# Altium PCB PCB-Oil Diffuser.PcbDoc (part 1 of 2)
Units mil, origin at the board's own origin, x right, y up, seen from the top; angles counter-clockwise.
Board outline 3000 x 3000 mil, 2 copper layers (Top Layer, Bottom Layer), stack 61.811 mil thick; 42 components, 28 nets, 129 pads, 48 vias.
Unrouted connection lines stored in the file: 7.
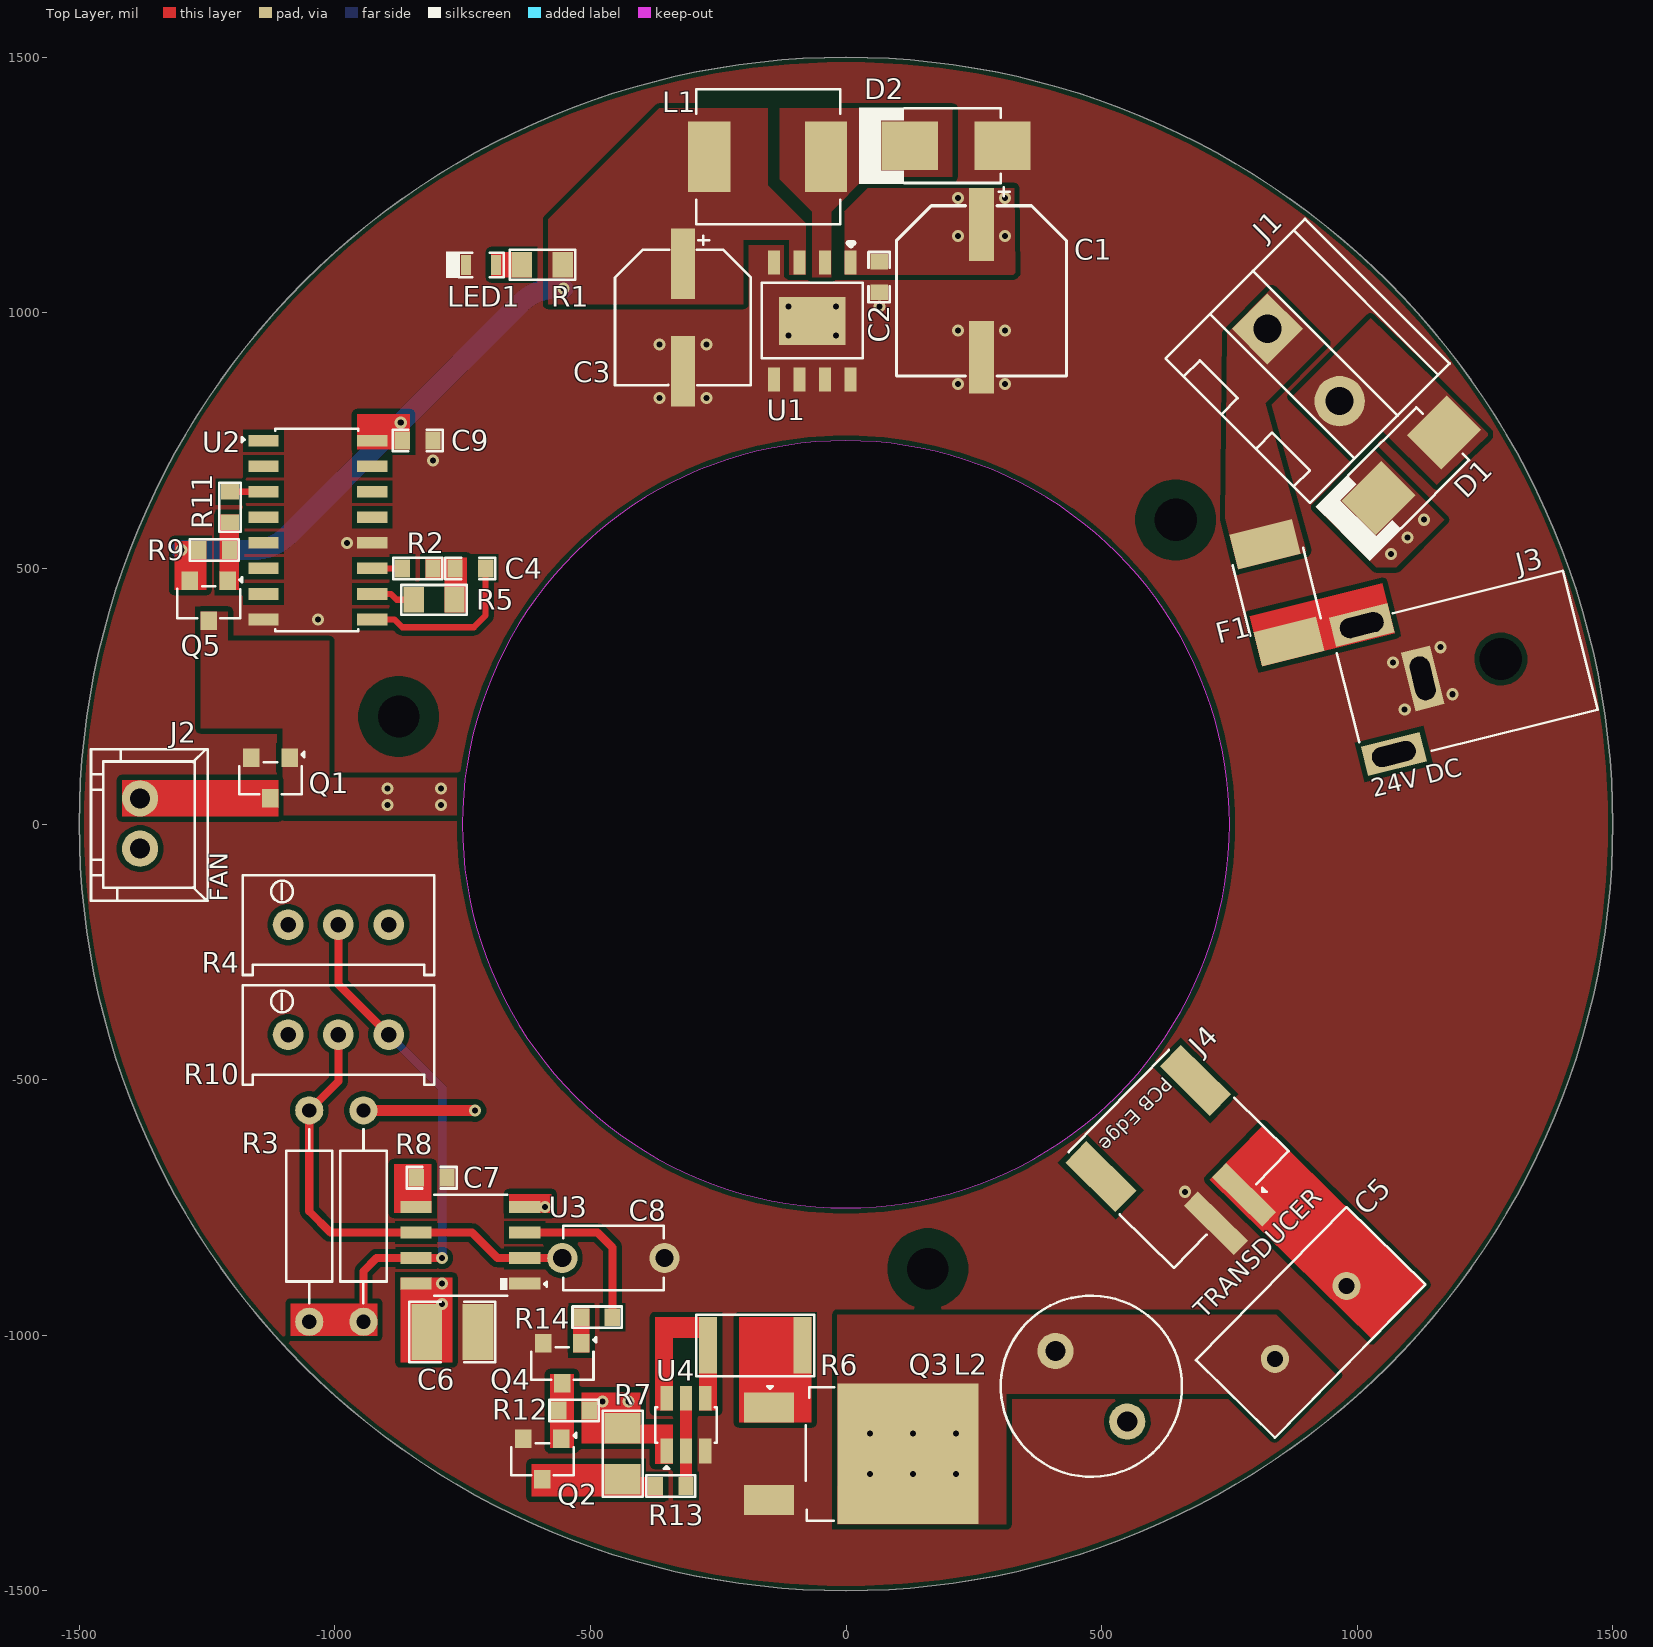
[diagram p0: Top Layer view]
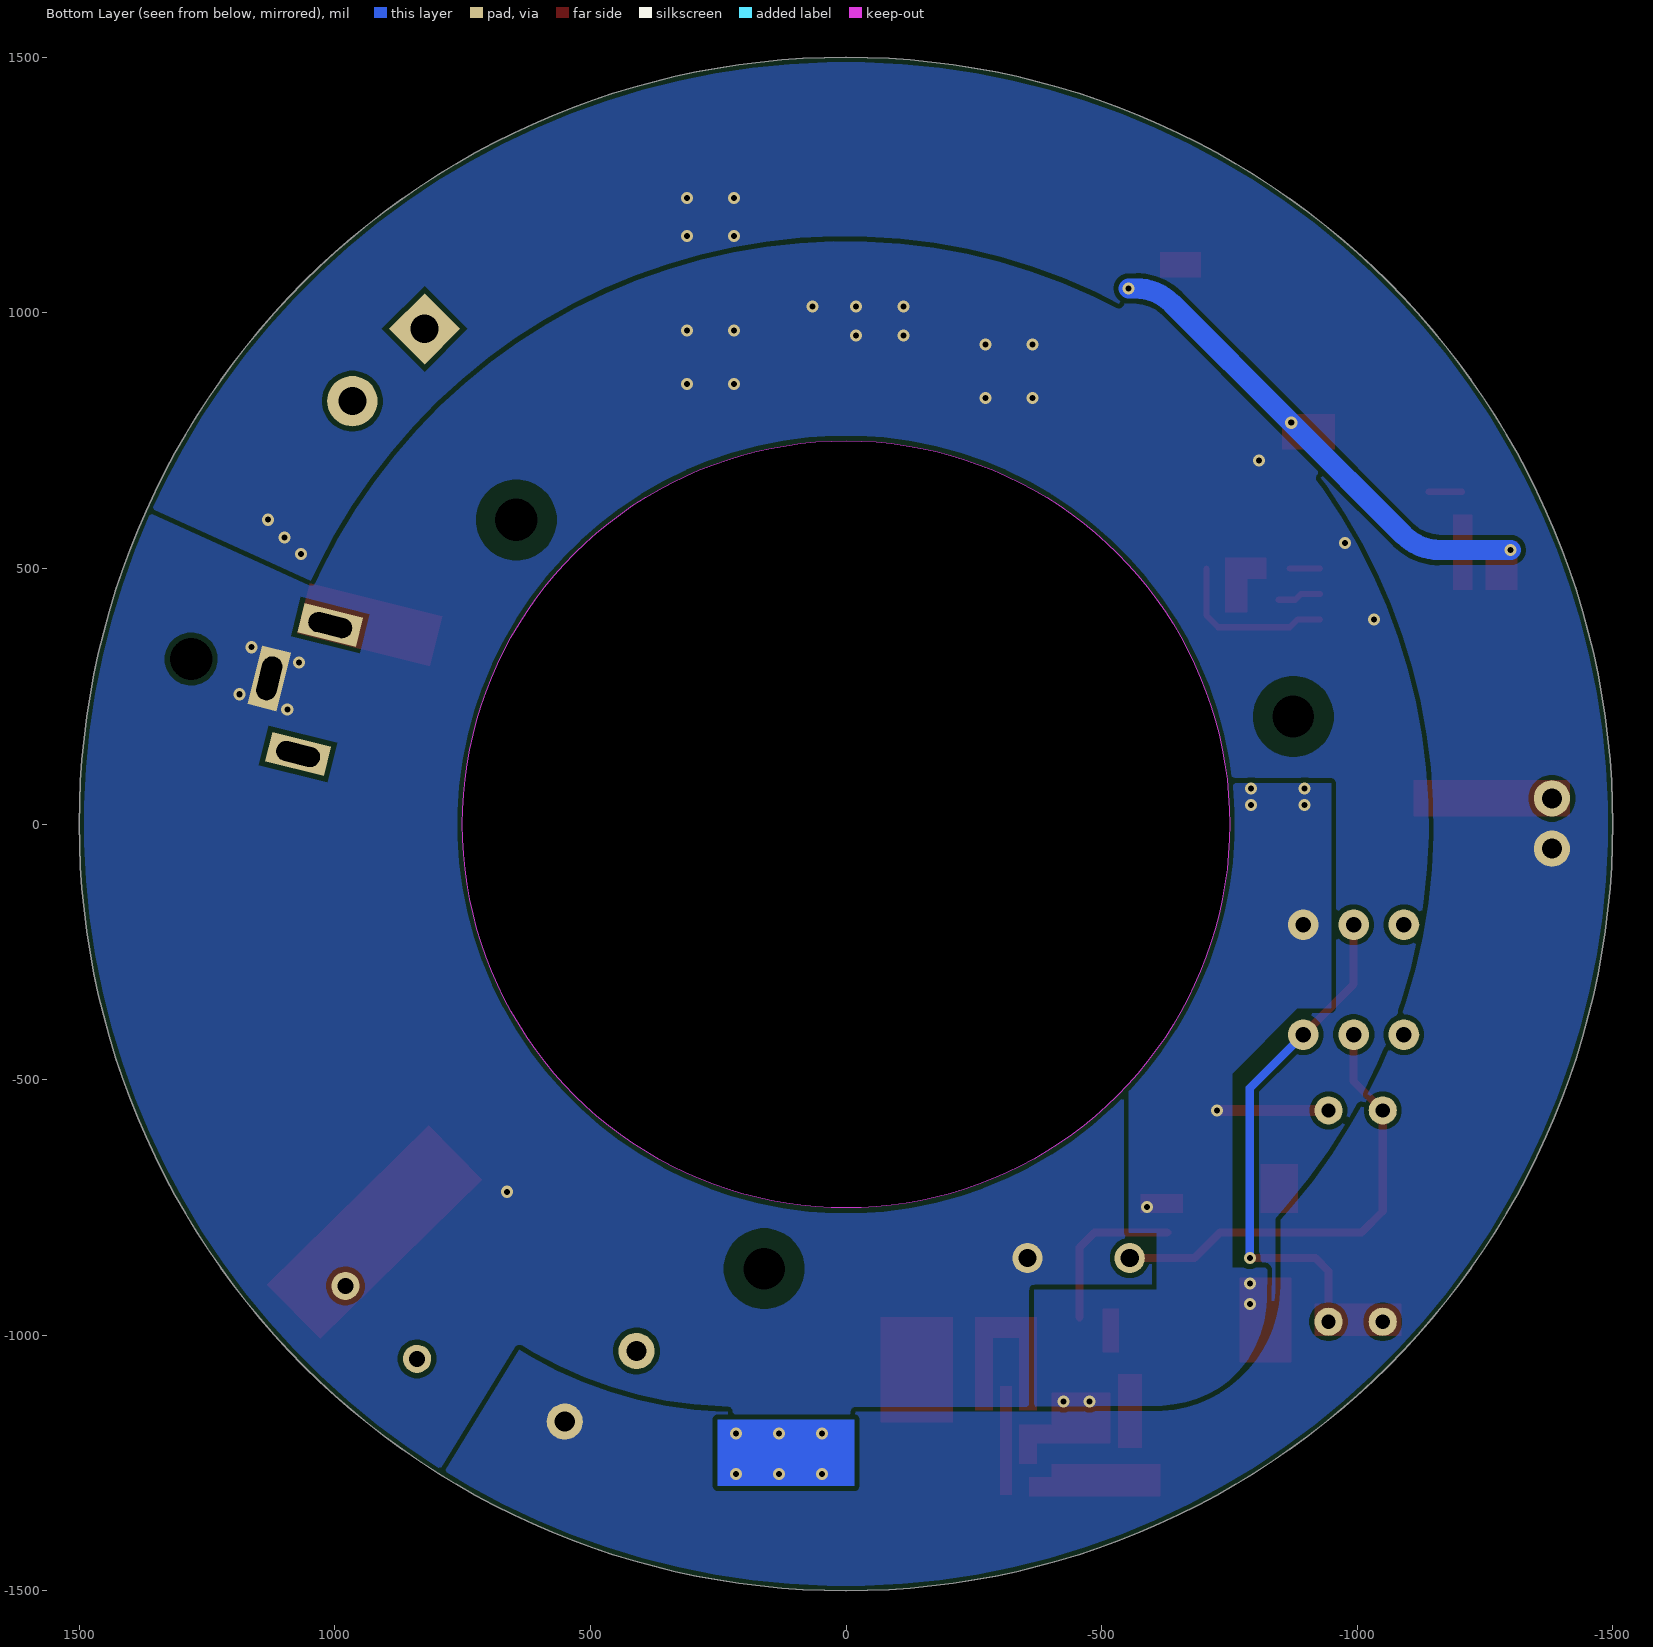
[diagram p1: Bottom Layer view, seen from below]
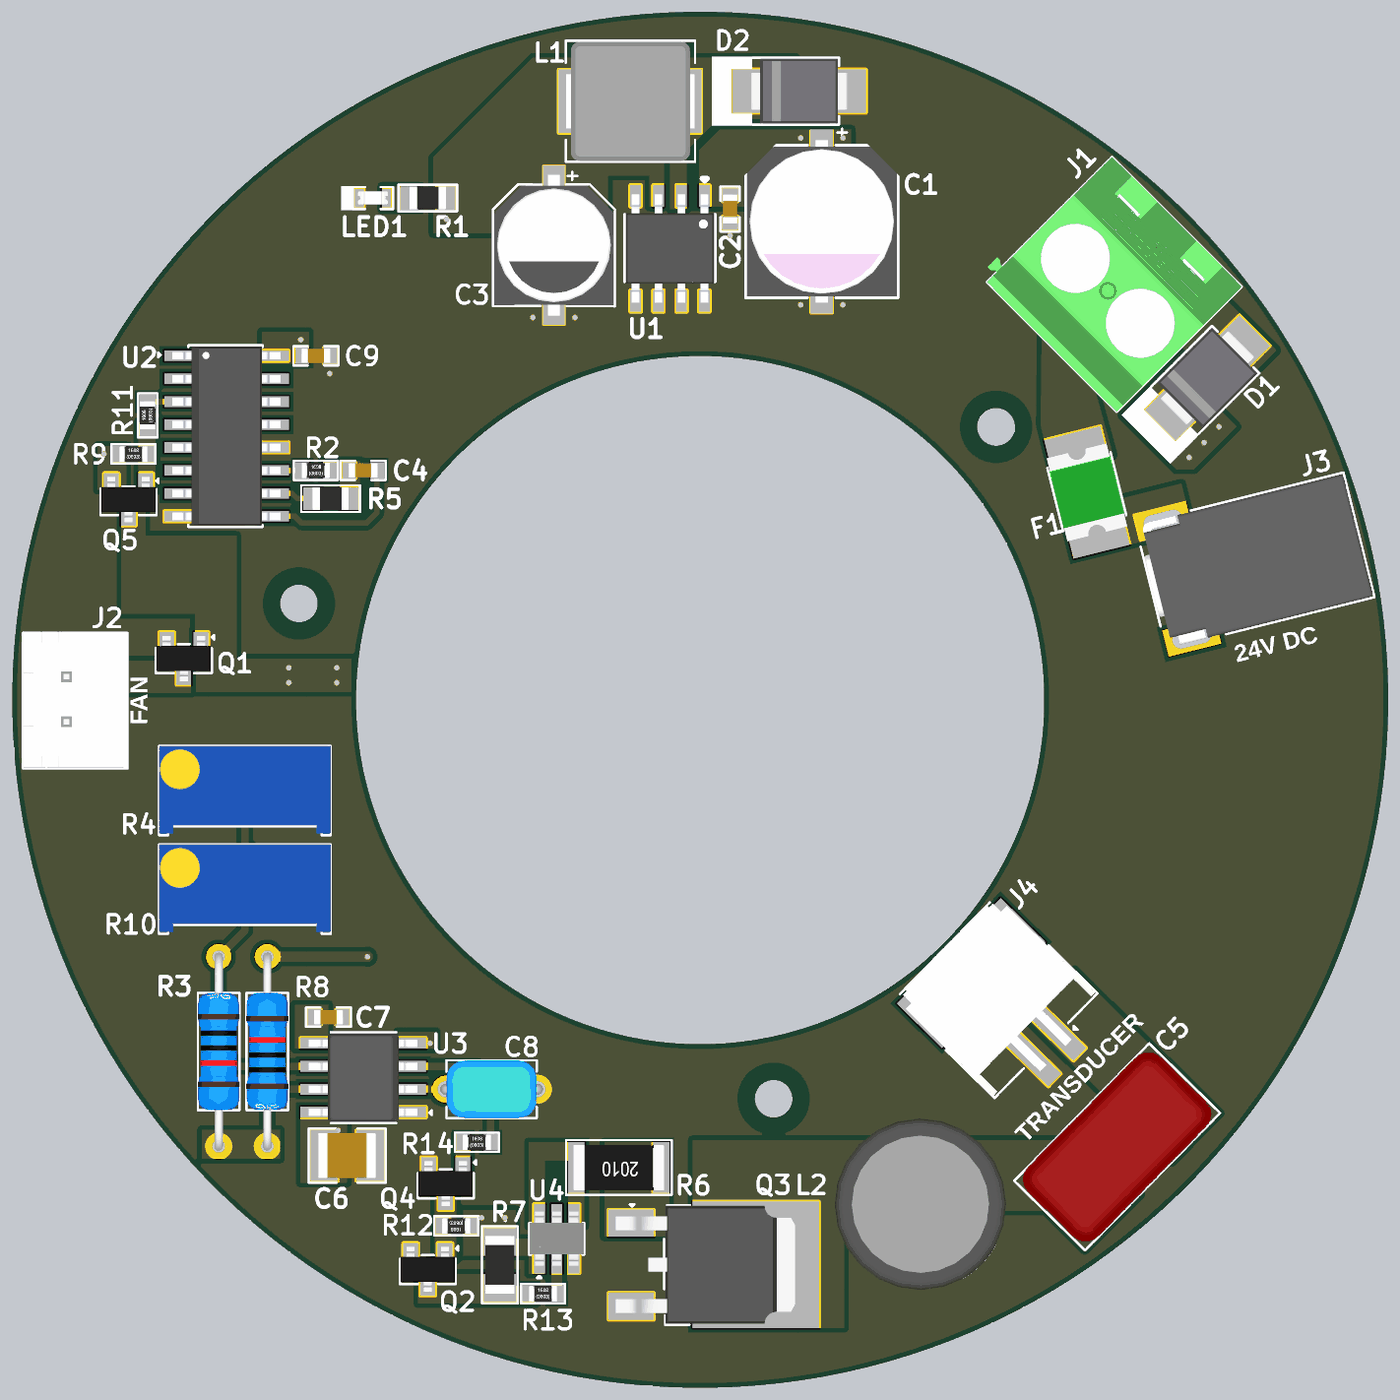
[diagram p2: 3D render of the assembled board from above, using the file's embedded part models]

## Layer stack, top to bottom
Top Solder: solder mask 0.394, Solder Resist, Dk 3.5
Top Layer: signal copper 1.378
Dielectric 1: dielectric 59.055, FR-4, Dk 4.8
Bottom Layer: signal copper 1.378
Bottom Solder: solder mask 0.394, Solder Resist, Dk 3.5

## Board outline
-1500,0 ccw(c0,0) 0,-1500 ccw(c0,0) 1500,0 ccw(c0,0) 0,1500 ccw(c0,0)
cut-out: -750.57,-0.78 ccw(c-0.15,-0.78) -0.15,-751.2 ccw(c-0.15,-0.78) 750.27,-0.78 ccw(c-0.15,-0.78) -0.15,749.64 ccw(c-0.15,-0.78)

## Design rules (kind name [scope] priority, off if disabled: settings)
BoardOutlineClearance [All] p1: gap=0 ignorepadtopadclearanceinfootprint=FALSE except(10: Track-OutlineEdge Poly-OutlineEdge)
Clearance [All] p1: gap=10 ignorepadtopadclearanceinfootprint=FALSE except(0: Arc-Hole Track-Hole SMDPad-Hole THPad-Hole Via-Hole Fill-Hole Poly-Hole Region-Hole Text-Hole; 7: SMDPad-SMDPad)
MinimumSolderMaskSliver [All] p1: minsoldermaskwidth=0
PolygonConnect [All] p1: connectstyle=Direct reliefconductorwidth=10 reliefentries=4 polygonreliefangle="90 Angle" airgapwidth=10
RoutingVias [All] p1: holewidth=11.81 width=23.62 viastyle="Through Hole" minholewidth=11.81 minwidth=23.62 maxholewidth=11.81 maxwidth=23.62
SilkToSilkClearance [All] p1: silktosilkclearance=0
SilkToSolderMaskClearance [IsPad] p1: minsilkscreentomaskgap=0 clearancetoexposedcopper=TRUE
SolderMaskExpansion [All] p1: expansion=4 istentingtop=FALSE
Width [All] p1: maxlimit=40 minlimit=10 preferedwidth=22
27 further rules are at their usual default settings.

## Components (designator, comment, footprint, x,y, rotation, side; value= is the part's Value field where it differs from the comment)
C1 "470uF" 189RV0027 265,1043 r270 top
C2 "1uF" Cap-0603 65,1070 r90 top
C3 "220uF" 189RV0019 -319,990.88 r270 top
C4 "2.2uF" Cap-0603 -735,500 r0 top
C5 "47nF" CFA2J473JC4PK5136A00 909,-975 r225.5 top
C6 "100uF" Cap-1210 -770,-994 r180 top
C7 "10nF" Cap-0603 -810.58,-692 r180 top
C8 "220pF" CD1H221JC9BECHE100 -455,-849.19 r180 top
C9 "1uF" Cap-0603 -838,750 r180 top
D1 "SS510B" SMB_ 1106,702 r225 top
D2 "SS510B" SMB_ 215.55,1327 r180 top
F1 "BSMD1812-150-33V" Fuse-1812_ 843.28,452.12 r104 top
J1 "1715721" 1715721 895,898 r315 top
J2 "XH-2A-L" XH-2A-L -1381,1 r270 top
J3 "DC-0360-2.5" DC-0360-2.5 1128.2,284.9 r194 top locked
J4 "WAFER-PH2.0-2PWB" WAFER-PH2.0-2PWB 671.13,-674.31 r225.5 top locked
L1 "68uH" PSPMAA0605H-680M-IGF -153.17,1305 r180 top
L2 "220uH" PK0810-221MB 480,-1100 r315.5 top
LED1 "White" LED-0603 -713.79,1093.86 r180 top
Q1 "AO3400A" sot-23 -1126,90 r180 top
Q2 "ZXTN2040FTA" SOT-23 -594,-1242 r180 top
Q3 "STD12N10L-VB" TO-252-2L -14.83,-1232 r270 top
Q4 "ZXTN2040FTA" SOT-23 -555,-1055 r180 top
Q5 "G7P03L" SOT-23-3L_ -1246.6,436.63 r180 top
R1 "1K" RES-0805 -594,1094 r0 top value=1kR
R2 "1M" Res-0603 -838,500 r180 top value=1MR
R3 "1K" Plugin,D2.3xL6.5mm -944,-767 r90 top
R4 "5k" 3296W-1-502 -993,-197 r0 top
R5 "100K" RES-0805 -805.87,438.58 r180 top
R6 "10R" RES-2010 -177.52,-1020 r180 top
R7 "1K" Res-1206 -437,-1232 r90 top
R8 "1.5K" Plugin,D2.3xL6.5mm -1050,-767 r270 top
R9 "10K" Res-0603 -1236,536 r180 top value=10kR
R10 "5k" 3296W-1-502 -993,-412 r0 top
R11 "47R" Res-0603 -1205,620 r270 top
R12 "1.5K" Res-0603 -532,-1147 r0 top
R13 "270R" Res-0603 -343,-1295 r180 top
R14 "1.5K" Res-0603 -487,-964.88 r180 top
U1 "XL1509E-12" ESOP-8 -66,984 r270 top
U2 "CD4060BM96" "16-SOIC (0.154\", 3.90mm Width)" -1033,575 r0 top
U3 "TS555IDTTR" "SOIC-8(0.154\", 3.90mm Width)" -734.79,-824.19 r180 top
U4 "ZXGD3002E6TA" SOT-23-6 -313,-1175 r90 top

## Footprints (in the part's own frame and the unit in brackets; to place one, negate y for a bottom-side part, rotate by r counter-clockwise, add the part's x,y. Pads: shape width x height; smd on the part's side, far side on the other; paste and mask are expansions set on the pad)
"16-SOIC (0.154\", 3.90mm Width)" [mm]
  rect 1.5x0.58 smd: 1(-2.7,4.445) 2(-2.7,3.175) 3(-2.7,1.905) 4(-2.7,0.635) 5(-2.7,-0.635) 6(-2.7,-1.905) 7(-2.7,-3.175) 8(-2.7,-4.445) 9(2.7,-4.445) 10(2.7,-3.175) 11(2.7,-1.905) 12(2.7,-0.635) 13(2.7,0.635) 14(2.7,1.905) 15(2.7,3.175) 16(2.7,4.445)
  silkscreen extent -3.78,-5.03 2,5.03, body extent -3,-4.95 3,4.95, height 1.75
189RV0019 [mm]
  rect 3.5x1.2 smd paste+0 mask+0.051: 1(-2.67,0) 2(2.67,0)
  silkscreen extent -4.07,-3.38 3.38,3.38, body extent -3.9,-3.3 3.9,3.3, height 7.75
189RV0027 [mm]
  rect 3.61x1.26 smd paste+0 mask+0.051: 1(-3.295,0) 2(3.295,0)
  silkscreen extent -5.15,-4.23 4.23,4.23, body extent -4.5,-4.15 4.5,4.15, height 6.95
3296W-1-502 [mil]
  round 60 hole 30 paste+0 mask+2: 1(-98.43,0) 2(0,0) 3(98.43,0)
  silkscreen extent -187,-98 187,96, body extent -187,-94 187,96, height 453
1715721 [mm]
  rect 2.5x2.5 hole 1.4 paste+0 mask+0.051: 1(-2.54,0)
  round 2.5 hole 1.4 paste+0 mask+0.051: 2(2.54,0)
  silkscreen extent -5.08,-4.62 5.08,5.18, body extent -5.64,-4.62 5.09,5.21, height 14.2
Cap-0603 [mil]
  rect 30x35 smd mask+2.36: 1(-30,0) 2(30,0)
  silkscreen extent -49,-21 49,21, body extent -32,-16 31,16, height 34
Cap-1210 [mil] "SMD 1210"
  rect 60x110 smd: 1(-50,0) 2(50,0)
  silkscreen extent -84,-59 84,59, body extent -63,-49 63,49, height 39
CD1H221JC9BECHE100 [mm]
  round 1.5 hole 0.9 paste+0 mask+0.05: 1(-2.54,0) 2(2.54,0)
  silkscreen extent -2.5,-1.6 2.5,1.6, body extent -2.84,-1.61 2.84,1.61, height 5.5
CFA2J473JC4PK5136A00 [mm]
  round 1.4 hole 0.8 paste+0 mask+0.05: 1(-2.54,0) 2(2.54,0)
  silkscreen extent -5.33,-2.75 5.33,2.75, body extent -5.25,-2.76 5.25,2.76, height 14.5
DC-0360-2.5 [mm]
  rect 1.5x3 hole 1 slot 2.2 at 90 deg mask+0.05: 2(0,0)
  rect 3x1.5 hole 1 slot 2.2 at 0 deg mask+0.05: 3(2.3,3.3) 4(2.3,-3.3)
  round 0 hole 2.1 unplated mask+0.05: MH(-4,0)
  silkscreen extent -8.05,-3.51 3.84,3.61, body extent -8.01,-3.45 3.79,3.56, height 9.65
ESOP-8 [mm]
  rect 1.2x0.6 smd: 1(-2.909,1.905) 2(-2.908,0.635) 3(-2.909,-0.635) 4(-2.909,-1.905) 5(2.909,-1.905) 6(2.909,-0.635) 7(2.909,0.635) 8(2.908,1.905)
  rect 2.4x3.3 smd: 9(0,0)
  silkscreen extent -3.88,-2.51 1.85,2.51, body extent -3,-2.45 3,2.45, height 1.75
Fuse-1812_ [mm]
  rect 1.78x3.2 smd: 1(-2.49,0) 2(2.49,0)
  silkscreen extent -1.75,-1.8 1.85,1.8, body extent -2.36,-1.74 2.37,1.74, height 1.03
LED-0603 [mm]
  rect 0.5x1 smd: 1(-0.75,0) 2(0.75,0)
  silkscreen extent -1.12,-0.66 1.75,0.66, body extent -0.82,-0.37 0.83,0.36, height 0.68
PK0810-221MB [mm]
  round 1.8 hole 1 paste+0 mask+0.051: 1(-2.5,0) 2(2.5,0)
  silkscreen extent -4.5,-4.5 4.5,4.5, body extent -4.75,-4.75 4.76,4.75, height 13.9
Plugin,D2.3xL6.5mm [mm]
  round 1.4 hole 0.7 paste+0 mask+0.051: 1(-5.25,0) 2(5.25,0)
  silkscreen extent -4.32,-1.15 4.32,1.15, body extent -5.47,-1.15 5.48,1.15, height 2.31
PSPMAA0605H-680M-IGF [mm]
  rect 2.1x3.5 smd: 1(-2.9,0) 2(2.9,0)
  silkscreen extent -3.61,-3.35 3.56,3.35, body extent -3.57,-3.29 3.53,3.31, height 5
Res-0603 [mil]
  rect 30x35 smd: 1(-30,0) 2(30,0)
  silkscreen extent -48,-21 48,21, body extent -31,-17 31,17, height 18
RES-0805 [mil] "SMD 0805"
  rect 40x50 smd: 1(-40,0) 2(40,0)
  silkscreen extent -64,-29 64,29, body extent -39,-25 39,24, height 24
Res-1206 [mil]
  rect 60x70 smd: 1(-50,0) 2(50,0)
  silkscreen extent -84,-39 84,39, body extent -63,-31 63,31, height 24
RES-2010 [mm]
  rect 0.9x2.8 smd: 1(-2.35,0) 2(2.35,0)
  silkscreen extent -2.92,-1.52 2.92,1.52, body extent -2.5,-1.25 2.5,1.25, height 0.6
SMB_ [mm]
  rect 2.8x2.4 smd: 1(-2.3,0) 2(2.3,0)
  silkscreen extent -2.21,-1.9 4.83,1.9, body extent -2.7,-1.8 2.7,1.8, height 2.3
"SOIC-8(0.154\", 3.90mm Width)" [mm]
  rect 1.55x0.6 smd: 1(-2.7,1.905) 2(-2.7,0.635) 3(-2.7,-0.635) 4(-2.7,-1.905) 5(2.7,-1.905) 6(2.7,-0.635) 7(2.7,0.635) 8(2.7,1.905)
  silkscreen extent -3.79,-2.51 1.8,2.51, body extent -3.01,-2.45 3.01,2.45, height 1.63
sot-23 [mm] "TRANS NPN 40V 0.6A SOT23"
  rect 0.82x0.92 smd: 1(-0.95,-1) 2(0.95,-1) 3(0,1)
  silkscreen extent -1.68,-1.3 1.55,0.81, body extent -1.5,-1.25 1.5,1.25, height 1.05
SOT-23 [mm] "TRANS NPN 40V 0.6A SOT23"
  rect 0.82x0.92 smd: 1(-0.95,-1) 2(0.95,-1) 3(0,1)
  silkscreen extent -1.68,-1.3 1.55,0.81, body extent -1.5,-1.25 1.5,1.25, height 1.05
SOT-23-3L_ [mm]
  rect 0.82x0.92 smd: 1(-0.95,-1) 2(0.95,-1) 3(0,1)
  silkscreen extent -1.65,-1.17 1.56,0.86, body extent -1.5,-1.25 1.5,1.25, height 1.1
SOT-23-6 [mm]
  rect 1.22x0.62 smd: 1(-1.31,0.95) 2(-1.31,0) 3(-1.31,-0.95) 4(1.31,-0.95) 5(1.31,0) 6(1.31,0.95)
  silkscreen extent -2.18,-1.52 0.86,1.52, body extent -1.5,-1.5 1.5,1.5, height 1.47
TO-252-2L [mm]
  rect 1.5x2.5 smd: 1(-2.3,-3.45) 3(2.3,-3.45)
  rect 7x7 smd: 2(0,3.45)
  silkscreen extent -3.35,-3.53 3.33,-0.2, body extent -3.27,-4.31 3.27,5.63, height 2.34
WAFER-PH2.0-2PWB [mm]
  rect 1x3.5 smd: 1(-1,2.85) 2(1,2.85)
  rect 1.5x3.5 smd: MP1(-3.35,-2.85) MP2(3.35,-2.85)
  silkscreen extent -4.09,-4.85 4.04,3.56, body extent -4.03,-4.8 3.97,3.7, height 5.59
XH-2A-L [mm]
  round 1.8 hole 1 paste+0 mask+0.051: 1(-1.251,0) 2(1.251,0)
  silkscreen extent -3.69,-2.45 3.83,3.35, body extent -3.75,-2.42 3.75,3.38, height 7.1

## Part data
C1: library part 189RV0027, "470uF 35V 850mA@100KHz 80mΩ@100KHz ±20% SMD,D8xL10.5mm Aluminum Electrolytic Capacitors - SMD ROHS", LCSC Part Number=C7471889, Manufacturer=KNSCHA, Package=SMD,D8xL10.5mm, ComponentLink1Description=LCSC, ComponentLink1URL=https://www.lcsc.com/product-detail/Aluminum-Electrolytic-Capacitors-SMD_KNSCHA-189RV0027_C7471889.html, Item Type=Capacitors, Manufacturer Part Number=189RV0027
C2 C9: library part TCC0603X5R105M250CT, "1uF 25V X5R ±20% 0603 Multilayer Ceramic Capacitors MLCC - SMD/SMT ROHS", LCSC Part Number=C6266891, Manufacturer=CCTC, ComponentLink1Description=LCSC, ComponentLink1URL=https://www.lcsc.com/product-detail/Multilayer-Ceramic-Capacitors-MLCC-SMD-SMT_CCTC-TCC0603X5R105M250CT_C6266891.html, Item Type=Capacitor, Manufacturer Part Number=TCC0603X5R105M250CT
C3: library part 189RV0019, "220uF 35V 600mA@100KHz 160mΩ@100KHz ±20% SMD,D6.3xL7.7mm Aluminum Electrolytic Capacitors - SMD ROHS", LCSC Part Number=C7471881, Manufacturer=KNSCHA, Package=SMD,D6.3xL7.7mm, ComponentLink1Description=LCSC, ComponentLink1URL=https://www.lcsc.com/product-detail/Aluminum-Electrolytic-Capacitors-SMD_KNSCHA-189RV0019_C7471881.html, Item Type=Capacitors, Manufacturer Part Number=189RV0019
C4: library part CC0603KRX5R8BB225, "CAP CER 2.2UF 25V X5R 0603", Case Code (Imperial)=0603, Case Code (Metric)=1608, Dielectric=X5R, LCSC Part Number=C309478, Manufacturer=Yageo, Max Operating Temperature=85°C, Min Operating Temperature=-55°C, Package Quantity=4000, Resistor Type=Ceramic, Supplier Part Number 1=311-1786-1-ND, Tolerance=10%, Voltage Rating=25V, Capacitance=2.2uF, Case/Package=0603, ComponentLink1Description=https://www.verical.com/server-webapp/html/getDatasheet?partID=782757&src-supplier=Verical, ComponentLink1URL=https://www.verical.com/server-webapp/html/getDatasheet?partID=782757&src-supplier=Verical, Depth=0.8mm, Halogen Free="Halogen Free", Item Type=Capacitor, Lead Free="Lead Free", Length=1.6mm, Manufacturer Part Number=CC0603KRX5R8BB225, Mount="Surface Mount", Packaging="Tape and Reel", Pricing 1="1=0.4, 10=0.276, 50=0.1932, 100=0.1656, 500=0.1242, 1000=0.10488 (USD)", Radiation Hardening=No, RoHS Compliant=Yes, Stock 1=687936, Supplier 1=Digi-Key, Termination=SMD/SMT, Thickness=0.037inch, Voltage Rating (DC)=25V, Weight=7.1E-05oz, Width=0.031inch
C5: library part CFA2J473JC4PK5136A00, "5% 630V 47nF Plugin,P=5.08mm Film Capacitors ROHS", LCSC Part Number=C20754717, Manufacturer=Dersonic, Package=Plugin,P=5.08mm, ComponentLink1Description=LCSC, ComponentLink1URL=https://www.lcsc.com/product-detail/Film-Capacitors_Dersonic-CFA2J473JC4PK5136A00_C20754717.html, Item Type=Capacitor, Manufacturer Part Number=CFA2J473JC4PK5136A00
C6: library part EMK325ABJ107MM-P, "CAP CER 100UF 16V X5R 1210", Case Code (Imperial)=1210, Case Code (Metric)=3225, LCSC Part Number=C90143, Manufacturer="Taiyo Yuden", Max Operating Temperature=85°C, Min Operating Temperature=-55°C, Supplier Part Number 1=587-5426-1-ND, Tolerance=20%, Voltage Rating=16V, Case/Package=1210, Category="Ceramic Capacitors", ComponentLink1Description=http://ds.yuden.co.jp/TYCOMPAS/ut/detail.do?productNo=EMK325ABJ107MM-P&fileName=EMK325ABJ107MM-P_SS&mode=specSheetDownload&src-supplier=Digi-Key, ComponentLink1URL=http://ds.yuden.co.jp/TYCOMPAS/ut/detail.do?productNo=EMK325ABJ107MM-P&fileName=EMK325ABJ107MM-P_SS&mode=specSheetDownload&src-supplier=Digi-Key, Item Type=Capacitor, Lead Free="Lead Free", Manufacturer Part Number=EMK325ABJ107MM-P, Mounting Technology="Surface Mount", Packaging="Cut Tape", Pricing 1="1=1.75, 10=1.415, 50=1.2352, 100=1.0809, 500=0.82352 (USD)", RoHS=Yes, RoHS Compliant=Yes, Series=M, Stock 1=81344, Supplier 1=Digi-Key
C7: library part GCM188R91H103KA37D, "CAP CER 10000PF 50V X8R 0603", Case/Package=0603, LCSC Part Number=C710687, Max Operating Temperature=150°C, Min Operating Temperature=-55°C, Ratings=AEC-Q200, Tolerance=10%, Voltage Rating=50V, Category="Ceramic Capacitors", ComponentLink1Description=LCSC, ComponentLink2Description=http://search.murata.co.jp/Ceramy/image/img/A01X/partnumbering_e_02.pdf?src-supplier=Digi-Key, ComponentLink2URL=http://search.murata.co.jp/Ceramy/image/img/A01X/partnumbering_e_02.pdf?src-supplier=Digi-Key, Item Type=Capacitor, Lead Free="Lead Free", Pricing="4000=0.01955, 8000=0.01909, 16000=0.01863, 24000=0.01817, 32000=0.01771 (USD)", RoHS=Yes, RoHS Compliant=Yes, Series=GCM, Stock=20000, Supplier=Avnet, Supplier Part Number=GCM188R91H103KA37D
C8: library part CD1H221JC9BECHE100, "±5% 50V 220pF NP0 Plugin,P=5.08mm Multilayer Ceramic Capacitors MLCC - Leaded ROHS", LCSC Part Number=C2761745, Manufacturer=Dersonic, Package=Plugin,P=5.08mm, ComponentLink1Description=LCSC, ComponentLink1URL=https://www.lcsc.com/product-detail/Multilayer-Ceramic-Capacitors-MLCC-Leaded_Dersonic-CD1H221JC9BECHE100_C2761745.html, Item Type=Capacitors, Manufacturer Part Number=CD1H221JC9BECHE100
D1 D2: "SCHOTTKY DIODE SMB 100V 5A", LCSC Part Number=C3011128, Manufacturer=MDD, Package=SMB, ComponentLink1Description=LCSC, ComponentLink1URL=https://www.lcsc.com/product-detail/Schottky-Barrier-Diodes-SBD_JUXING-SS510B_C3011128.html, Item Type=Diode, Manufacturer Part Number=SS510B
F1: "33V 1.5A 40A 3A 1812 Resettable Fuses ROHS", LCSC Part Number=C883154, Manufacturer=BHFUSE, Package=1812, ComponentLink1Description=LCSC, ComponentLink1URL=https://www.lcsc.com/product-detail/Resettable-Fuses_BHFUSE-BSMD1812-150-33V_C883154.html, Item Type=Fuse, Manufacturer Part Number=BSMD1812-150-33V
J1: "TERM BLK 2P SIDE ENT 5.08MM PCB", LCSC Part Number=C480516, Manufacturer="Phoenix Contact", ComponentLink1Description=https://datasheet.ciiva.com/1120/1697161-1120393.pdf?src-supplier=Farnell, ComponentLink1URL=https://datasheet.ciiva.com/1120/1697161-1120393.pdf?src-supplier=Farnell, ComponentLink2Description=https://datasheet.ciiva.com/832/1715721-832095.pdf?src-supplier=Digikey, ComponentLink2URL=https://datasheet.ciiva.com/832/1715721-832095.pdf?src-supplier=Digikey, ComponentLink3Description=https://datasheet.ciiva.com/15169/getdatasheetpartid-212174-15169929.pdf?src-supplier=Verical, ComponentLink3URL=https://datasheet.ciiva.com/15169/getdatasheetpartid-212174-15169929.pdf?src-supplier=Verical, ComponentLink4Description=https://datasheet.ciiva.com/16046/1715721-16046034.pdf?src-supplier=Onlinecomponents.com, ComponentLink4URL=https://datasheet.ciiva.com/16046/1715721-16046034.pdf?src-supplier=Onlinecomponents.com, Item Type="Terminal Blocks", Manufacturer Part Number=1715721, Pricing="1=0.94 (USD)", RoHS=Yes, Stock=13160, Supplier=Digikey
J2: "1x2P 2P XH 1 Tin 2.5mm 2 -25℃~+85℃ Brass 3A Straight Plugin,P=2.5mm Wire To Board Connector ROHS", LCSC Part Number=C2908597, Manufacturer=HCTL, Package=Plugin,P=2.5mm, ComponentLink1Description=LCSC, ComponentLink1URL=https://www.lcsc.com/product-detail/Wire-To-Board-Connector_HCTL-XH-2A-L_C2908597.html, Item Type="Wire To Board Connector", Manufacturer Part Number=XH-2A-L
J3: "DC Power Receptacle 260℃ Brass -20℃~+70℃ 2.5mm 6mm 2.5A 24V Plugin AC/DC Power Connectors ROHS", LCSC Part Number=C319122, Manufacturer="XKB Connectivity", Package=Plugin, ComponentLink1Description=LCSC, ComponentLink1URL=https://www.lcsc.com/product-detail/AC-DC-Power-Connectors_XKB-Connectivity-DC-0360-2-5_C319122.html, Item Type="DC Jack", Manufacturer Part Number=DC-0360-2.5
J4: "1x2P 1 2mm Male pin 2 -25℃~+85℃ 2A Surface Mount SMD,P=2mm Wire To Board / Wire To Wire Connector ROHS", LCSC Part Number=C3029440, Manufacturer=XUNPU, Package=SMD,P=2mm, ComponentLink1Description=LCSC, ComponentLink1URL=https://www.lcsc.com/product-detail/Wire-To-Board-Wire-To-Wire-Connector_XUNPU-WAFER-PH2-0-2PWB_C3029440.html, Item Type="Right Angle JST", Manufacturer Part Number=WAFER-PH2.0-2PWB
L1: library part PSPMAA0605H-680M-IGF, "2A 68uH ±20% 2.5A SMD,6.6x7.1mm Power Inductors ROHS", LCSC Part Number=C2983094, Manufacturer="PROD Tech", Package=SMD,6.6x7.1mm, ComponentLink1Description=LCSC, ComponentLink1URL=https://www.lcsc.com/product-detail/Power-Inductors_PROD-Tech-PSPMAA0605H-680M-IGF_C2983094.html, Item Type=Inductor, Manufacturer Part Number=PSPMAA0605H-680M-IGF
L2: library part PK0810-221MB, "600mA 220uH EI-core Inductor ±20% Plugin Power Inductors ROHS", LCSC Part Number=C400317, Manufacturer=SXN, Package=Plugin, ComponentLink1Description=LCSC, ComponentLink1URL=https://www.lcsc.com/product-detail/Power-Inductors_SXN-Shun-Xiang-Nuo-Elec-PK0810-221MB_C400317.html, Item Type=Inductor, Manufacturer Part Number=PK0810-221MB
LED1: library part NCD0603W3, "White light 0603 Light Emitting Diodes (LED) ROHS", LCSC Part Number=C158100, Manufacturer="Foshan NationStar Optoelectronics", Package=0603, ComponentLink1Description=LCSC, ComponentLink1URL=https://www.lcsc.com/product-detail/Light-Emitting-Diodes-LED_Foshan-NationStar-Optoelectronics-NCD0603W3_C158100.html, Item Type=LED, Manufacturer Part Number=NCD0603W3
Q1: "30V 5.8A 32mΩ@10V,5.8A 1.4W 1.4V@250uA N Channel SOT-23 MOSFETs ROHS", LCSC Part Number=C344010, Manufacturer=BORN, ComponentLink1Description=LCSC, ComponentLink1URL=https://www.lcsc.com/product-detail/MOSFETs_BORN-AO3400A_C344010.html, Item Type=Mosfet, Manufacturer Part Number=AO3400A
Q2 Q4: "TRANS NPN 40V 1A SOT23-3", LCSC Part Number=C460141, Manufacturer="Diodes Zetex", ComponentLink1Description=https://datasheet.ciiva.com/973/zxtn2040f-973922.pdf?src-supplier=Digikey, ComponentLink1URL=https://datasheet.ciiva.com/973/zxtn2040f-973922.pdf?src-supplier=Digikey, ComponentLink2Description=https://datasheet.ciiva.com/17037/0900766b80d2efd3-17037010.pdf?src-supplier=Allied+Electronics, ComponentLink2URL=https://datasheet.ciiva.com/17037/0900766b80d2efd3-17037010.pdf?src-supplier=Allied+Electronics, ComponentLink3Description=https://datasheet.ciiva.com/15139/getdatasheetpartid-76608-15139038.pdf?src-supplier=Verical, ComponentLink3URL=https://datasheet.ciiva.com/15139/getdatasheetpartid-76608-15139038.pdf?src-supplier=Verical, ComponentLink4Description=https://datasheet.ciiva.com/973/zxtn2040f-973923.pdf?src-supplier=Digikey, ComponentLink4URL=https://datasheet.ciiva.com/973/zxtn2040f-973923.pdf?src-supplier=Digikey, ComponentLink5Description=https://datasheet.ciiva.com/973/zxtn2040f-973924.pdf?src-supplier=Digikey, ComponentLink5URL=https://datasheet.ciiva.com/973/zxtn2040f-973924.pdf?src-supplier=Digikey, ComponentLink6Description=https://datasheet.ciiva.com/11201/zxtn2040f-11201581.pdf?src-supplier=Avnet, ComponentLink6URL=https://datasheet.ciiva.com/11201/zxtn2040f-11201581.pdf?src-supplier=Avnet, ComponentLink7Description=https://datasheet.ciiva.com/11206/zxtn2040f-11206668.pdf?src-supplier=Avnet, ComponentLink7URL=https://datasheet.ciiva.com/11206/zxtn2040f-11206668.pdf?src-supplier=Avnet, ComponentLink8Description=https://datasheet.ciiva.com/16508/zxtn2040f-16508997.pdf?src-supplier=Future+Electronics, ComponentLink8URL=https://datasheet.ciiva.com/16508/zxtn2040f-16508997.pdf?src-supplier=Future+Electronics, Item Type=BJTs, Manufacturer Part Number=ZXTN2040FTA, Pricing="1=0.38, 10=0.258, 100=0.1744, 500=0.13526, 1000=0.12224 (USD)", RoHS=Yes, Stock=9989, Supplier=Digikey
Q3: "100V 15A 96W 114mΩ@10V,3A 3.5V@250uA 1 N-Channel TO-252 MOSFETs ROHS", LCSC Part Number=C5179533, Manufacturer=VBsemi, Package=TO-252, ComponentLink1Description=LCSC, ComponentLink1URL=https://www.lcsc.com/product-detail/MOSFETs_VBsemi-Elec-STD12N10L-VB_C5179533.html, Item Type=MOSFETs, Manufacturer Part Number=STD12N10L-VB
Q5: "30V 7A 19mΩ 1.9W 1.1V@250uA P Channel SOT-23-3L MOSFETs ROHS", LCSC Part Number=C840062, Manufacturer=GoFord, Category=Uncategorized, ComponentLink1Description=LCSC, ComponentLink1URL=https://www.lcsc.com/product-detail/MOSFETs_GOFORD-G7P03L_C840062.html, Item Type=Mosfet, Manufacturer Part Number=G7P03L, Pricing 1="1=0.45000, 10=0.36500, 100=0.24860, 500=0.18648, 1000=0.13986 (USD)", RoHS=No, Stock 1=6672, Supplier 1=Digi-Key
R1: library part RC0805FR-071KL, "RES 1K OHM 1% 1/8W 0805", Case Code (Imperial)=0805, Case Code (Metric)=2012, LCSC Part Number=C95781, Manufacturer=Yageo, Max Operating Temperature=155°C, Max Power Dissipation=125mW, Min Operating Temperature=-55°C, Package Quantity=1, Resistance Tolerance=1%, Resistor Type="Thick Film", Supplier Part Number=8126013, Temperature Coefficient=100ppm/°C, Voltage Rating=150V, Case/Package=0805, Category="Chip SMD Resistors", ComponentLink1Description=https://datasheet.ciiva.com/7941/1686128-7941719.pdf?src-supplier=Element14, ComponentLink1URL=https://datasheet.ciiva.com/7941/1686128-7941719.pdf?src-supplier=Element14, ComponentLink2Description=https://datasheet.ciiva.com/46385/444164-46385020.pdf?src-supplier=Element14, ComponentLink2URL=https://datasheet.ciiva.com/46385/444164-46385020.pdf?src-supplier=Element14, ComponentLink3Description=https://datasheet.ciiva.com/2456/pyu-r-int-thick-7-2456976.pdf?src-supplier=Digi-Key, ComponentLink3URL=https://datasheet.ciiva.com/2456/pyu-r-int-thick-7-2456976.pdf?src-supplier=Digi-Key, ComponentLink4Description=https://datasheet.ciiva.com/2456/pyu-r-int-thick-7-2456977.pdf?src-supplier=Digi-Key, ComponentLink4URL=https://datasheet.ciiva.com/2456/pyu-r-int-thick-7-2456977.pdf?src-supplier=Digi-Key, ComponentLink5Description=https://datasheet.ciiva.com/2456/pyu-r-int-thick-7-2456975.pdf?src-supplier=Digi-Key, ComponentLink5URL=https://datasheet.ciiva.com/2456/pyu-r-int-thick-7-2456975.pdf?src-supplier=Digi-Key, ComponentLink6Description=https://datasheet.ciiva.com/16850/rc0805-16850409.pdf?src-supplier=Future+Electronics, ComponentLink6URL=https://datasheet.ciiva.com/16850/rc0805-16850409.pdf?src-supplier=Future+Electronics, Construction=Rectangular, Depth=1.25mm, Features="Moisture Resistant", Height=0.024inch, Item Type=Resistor, Lead Free=5697LeadFree, Length=0.079inch, Manufacturer Part Number=RC0805FR-071KL, Military Standard=Not, Number of Terminations=2, Packaging="Tape and Reel", Pins=2, Power Rating=125mW, Pricing="5000=0.117, 25000=0.112, 125000=0.107, 500000=0.104, 1250000=0.0981 (USD)", Reach SVHC Compliant=No, RoHS=Yes, RoHS Compliant=Yes, Series=RC, Stock=8305000, Supplier="Future Electronics", Termination=SMD/SMT, Tolerance=1%, Voltage Rating (AC)=150V, Voltage Rating (DC)=150V, Width=0.049inch
R2: library part CRCW06031M00FKEA, "RES SMD 1M OHM 1% 1/10W 0603", Case Code (Imperial)=0603, Case Code (Metric)=1608, LCSC Part Number=C844922, Manufacturer=Vishay, Max Operating Temperature=155°C, Max Power Dissipation=100mW, Min Operating Temperature=-55°C, Package Quantity=10, Resistance Tolerance=1%, Resistor Type="Thick Film", Temperature Coefficient=100ppm/°C, Voltage Rating=75V, Case/Package=0603, ComponentLink1Description=https://datasheet.ciiva.com/11809/0900766b80d98afc-11809074.pdf?src-supplier=Rs, ComponentLink1URL=https://datasheet.ciiva.com/11809/0900766b80d98afc-11809074.pdf?src-supplier=Rs, ComponentLink2Description=https://datasheet.ciiva.com/7841/125364-7841823.pdf?src-supplier=Element14, ComponentLink2URL=https://datasheet.ciiva.com/7841/125364-7841823.pdf?src-supplier=Element14, ComponentLink3Description=https://datasheet.ciiva.com/7841/1720486-7841822.pdf?src-supplier=Element14, ComponentLink3URL=https://datasheet.ciiva.com/7841/1720486-7841822.pdf?src-supplier=Element14, ComponentLink4Description=https://datasheet.ciiva.com/26314/fld-crcw-e3-data-en-26314645.pdf?src-supplier=Distrelec, ComponentLink4URL=https://datasheet.ciiva.com/26314/fld-crcw-e3-data-en-26314645.pdf?src-supplier=Distrelec, ComponentLink5Description=https://datasheet.ciiva.com/2465/dcrcwe3-2465550.pdf?src-supplier=Digikey, ComponentLink5URL=https://datasheet.ciiva.com/2465/dcrcwe3-2465550.pdf?src-supplier=Digikey, ComponentLink6Description=https://datasheet.ciiva.com/2465/dcrcwe3-2465551.pdf?src-supplier=Digikey, ComponentLink6URL=https://datasheet.ciiva.com/2465/dcrcwe3-2465551.pdf?src-supplier=Digikey, ComponentLink7Description=https://datasheet.ciiva.com/2465/dcrcwe3-2465549.pdf?src-supplier=Digikey, ComponentLink7URL=https://datasheet.ciiva.com/2465/dcrcwe3-2465549.pdf?src-supplier=Digikey, ComponentLink8Description=https://datasheet.ciiva.com/16311/dcrcwe3-16311533.pdf?src-supplier=Future+Electronics, ComponentLink8URL=https://datasheet.ciiva.com/16311/dcrcwe3-16311533.pdf?src-supplier=Future+Electronics, Construction=Rectangular, Contact Plating=Tin, Depth=0.85mm, Features="Automotive AEC-Q200", Height=0.45mm, Item Type=Resistors, Lead Free=5697LeadFree, Length=1.55mm, Manufacturer Part Number=CRCW06031M00FKEA, Military Standard=Not, Number of Terminations=2, Packaging="Tape and Reel", Pins=2, Power Rating=100mW, Pricing="1=0.1, 10=0.027, 50=0.0166, 100=0.0138, 500=0.00934, 1000=0.00802 (USD)", Radiation Hardening=No, Reach SVHC Compliant=Unknown, RoHS=Yes, RoHS Compliant=Yes, Series=CRCW, Stock=380955, Supplier=Digikey, Technology="THICK FILM", Termination=SMD/SMT, Tolerance=1%, Voltage Rating (DC)=75V, Weight=7.1E-05oz, Width=0.033inch
R3: library part "MF14W 1KR", "Metal Film Resistors 1kΩ 250mW ±200ppm/℃ ±1% Plugin,D2.3xL6.5mm Through Hole Resistors ROHS", LCSC Part Number=C713997, Manufacturer="Huaxing Mechanical-Elec", Manufacturer Part Number=MF1/4W-1KΩ±1%T52, Package=Plugin,D2.3xL6.5mm, ComponentLink1Description=LCSC, ComponentLink1URL=https://www.lcsc.com/product-detail/Through-Hole-Resistors_Huaxing-Mechanical-Elec-MF1-4W-1K-1-T52_C713997.html, Item Type=Resistors
R4 R10: library part 3296W-1-502, "10% 5kΩ Plugin Potentiometers, Variable Resistors ROHS", LCSC Part Number=C118907, Manufacturer=BOCHEN, ComponentLink1Description=LCSC, ComponentLink1URL=https://www.lcsc.com/product-detail/Potentiometers-Variable-Resistors_BOCHEN-Chengdu-Guosheng-Tech-3296W-1-502_C118907.html, Item Type=Potentiometer, Manufacturer Part Number=3296W-1-502
R5: library part RC0805FR-07100KL, "RES 100K OHM 1% 1/8W 0805", Case Code (Imperial)=0805, Case Code (Metric)=2012, LCSC Part Number=C96346, Manufacturer=Yageo, Max Operating Temperature=155°C, Max Power Dissipation=125mW, Min Operating Temperature=-55°C, Package Quantity=1, Resistance=100kR, Resistance Tolerance=1%, Resistor Type="Thick Film", Temperature Coefficient=100ppm/°C, Voltage Rating=150V, Case/Package=0805, Category="Chip SMD Resistors", ComponentLink1Description=https://datasheet.ciiva.com/11808/0900766b8106beab-11808858.pdf?src-supplier=RSComponents, ComponentLink1URL=https://datasheet.ciiva.com/11808/0900766b8106beab-11808858.pdf?src-supplier=RSComponents, ComponentLink2Description=https://datasheet.ciiva.com/7941/1686128-7941677.pdf?src-supplier=Element14, ComponentLink2URL=https://datasheet.ciiva.com/7941/1686128-7941677.pdf?src-supplier=Element14, ComponentLink3Description=https://datasheet.ciiva.com/7660/38627-7660796.pdf?src-supplier=Element14, ComponentLink3URL=https://datasheet.ciiva.com/7660/38627-7660796.pdf?src-supplier=Element14, ComponentLink4Description=https://datasheet.ciiva.com/22747/444164-22747534.pdf?src-supplier=Element14, ComponentLink4URL=https://datasheet.ciiva.com/22747/444164-22747534.pdf?src-supplier=Element14, ComponentLink5Description=https://datasheet.ciiva.com/2457/pyu-r-int-thick-7-2457018.pdf?src-supplier=Digi-Key, ComponentLink5URL=https://datasheet.ciiva.com/2457/pyu-r-int-thick-7-2457018.pdf?src-supplier=Digi-Key, ComponentLink6Description=https://datasheet.ciiva.com/2457/pyu-r-int-thick-7-2457019.pdf?src-supplier=Digi-Key, ComponentLink6URL=https://datasheet.ciiva.com/2457/pyu-r-int-thick-7-2457019.pdf?src-supplier=Digi-Key, ComponentLink7Description=https://datasheet.ciiva.com/2457/pyu-r-int-thick-7-2457017.pdf?src-supplier=Digi-Key, ComponentLink7URL=https://datasheet.ciiva.com/2457/pyu-r-int-thick-7-2457017.pdf?src-supplier=Digi-Key, ComponentLink8Description=https://datasheet.ciiva.com/12667/rc0805-12667001.pdf?src-supplier=Mouser, ComponentLink8URL=https://datasheet.ciiva.com/12667/rc0805-12667001.pdf?src-supplier=Mouser, ComponentLink9Description=https://datasheet.ciiva.com/7941/1697719-7941676.pdf?src-supplier=Element14, ComponentLink9URL=https://datasheet.ciiva.com/7941/1697719-7941676.pdf?src-supplier=Element14, ComponentLink10Description=https://datasheet.ciiva.com/7941/1697719-7941678.pdf?src-supplier=Element14, ComponentLink10URL=https://datasheet.ciiva.com/7941/1697719-7941678.pdf?src-supplier=Element14, ComponentLink11Description=https://datasheet.ciiva.com/16747/rc0805-16747226.pdf?src-supplier=Future+Electronics, ComponentLink11URL=https://datasheet.ciiva.com/16747/rc0805-16747226.pdf?src-supplier=Future+Electronics, Construction=Rectangular, Depth=1.25mm, Features="Moisture Resistant", Height=0.024inch, Item Type=Resistor, Lead Free="Lead Free", Lead Pitch=0.4mm, Length=0.079inch, Manufacturer Part Number=RC0805FR-07100KL, Military Standard=Not, Number of Pins=2, Number of Terminations=2, Packaging="Tape and Reel", Power Rating=125mW, Pricing 1="5000=0.00227, 10000=0.00224, 20000=0.00217 (USD)", RoHS=Yes, RoHS Compliant=Yes, Series=RC, Size Code=0805, Stock 1=695000, Supplier 1=Avnet, Supplier Part Number 1=RC0805FR-07100KL, Technology="THICK FILM", Termination=SMD/SMT, Tolerance=1%, Voltage Rating (DC)=150V, Width=0.049inch
R6: library part RC2010FK-0710RL, "RES 10 OHM 1% 3/4W 2010", LCSC Part Number=C137067, Manufacturer=Yageo, ComponentLink1Description=https://datasheet.ciiva.com/12667/pyu-rc2010-51-rohs-l-4-12667047.pdf?src-supplier=Mouser, ComponentLink1URL=https://datasheet.ciiva.com/12667/pyu-rc2010-51-rohs-l-4-12667047.pdf?src-supplier=Mouser, ComponentLink2Description=https://datasheet.ciiva.com/7672/1563630-7672315.pdf?src-supplier=Element14, ComponentLink2URL=https://datasheet.ciiva.com/7672/1563630-7672315.pdf?src-supplier=Element14, ComponentLink3Description=https://datasheet.ciiva.com/7672/1563630-7672316.pdf?src-supplier=Element14, ComponentLink3URL=https://datasheet.ciiva.com/7672/1563630-7672316.pdf?src-supplier=Element14, ComponentLink4Description=https://datasheet.ciiva.com/17422/pyu-rc2010-51-rohs-l-4-17422060.pdf?src-supplier=Future+Electronics, ComponentLink4URL=https://datasheet.ciiva.com/17422/pyu-rc2010-51-rohs-l-4-17422060.pdf?src-supplier=Future+Electronics, Item Type=Resistors, Manufacturer Part Number=RC2010FK-0710RL, Pricing="4000=0.041, 12000=0.0395, 20000=0.0388, 60000=0.0374, 100000=0.0362 (USD)", RoHS=Yes, Stock=8000, Supplier="Future Electronics"
R7: library part RC1206FR-7W1KL, "RES 1K OHM 1% 1/2W 1206", LCSC Part Number=C859155, Manufacturer=Yageo, Supplier Part Number 1=13-RC1206FR-7W1KLCT-ND, Category="Chip SMD Resistors", ComponentLink1Description=LCSC, ComponentLink1URL=https://www.lcsc.com/product-detail/Chip-Resistor-Surface-Mount_YAGEO-RC1206FR-7W1KL_C859155.html, Item Type=Resistor, Manufacturer Part Number=RC1206FR-7W1KL, Pricing 1="1=0.19000, 10=0.15700, 100=0.06150, 1000=0.02572, 2500=0.02358 (USD)", RoHS=Yes, RoHS Compliant=Yes, Stock 1=6215, Supplier 1=Digi-Key
R8: library part "MF14W 1.5KR", "Metal Film Resistors 1.5kΩ 250mW ±100ppm/℃ ±1% Plugin,D2.3xL6.5mm Through Hole Resistors ROHS", LCSC Part Number=C119328, Manufacturer=CCO, Manufacturer Part Number="MF1/4W-1.5KΩ±1% T", Package=Plugin,D2.3xL6.5mm, ComponentLink1Description=LCSC, ComponentLink1URL=https://www.lcsc.com/product-detail/Through-Hole-Resistors_CCO-Chian-Chia-Elec-MF1-4W-1-5K-1-T_C119328.html, Item Type=Resistors
R9: library part RT0603BRD0710KL, "RES SMD 10K OHM 0.1% 1/10W 0603", Case/Package=0603, LCSC Part Number=C95204, Manufacturer=Yageo, Max Operating Temperature=155°C, Min Operating Temperature=-55°C, Package Height=0.45mm, Package Length=1.6mm, Package Style=SMTMeter, Package Width=0.8mm, Power=100mW, Rated Temperature=70°C, Resistor Type="FIXED RESISTOR", Supplier Part Number 1=1991391P, Temperature Coefficient=25ppm/°C, Tolerance=0.1%, Working Voltage=75V, Category="Chip SMD Resistors", ComponentLink1Description=https://datasheet.ciiva.com:443/pdfs/VipMasterIC/IC/YAGO/YAGO-S-A0008510989/YAGO-S-A0008510989-1.pdf?src-supplier=IHS+Markit, ComponentLink1URL=https://datasheet.ciiva.com:443/pdfs/VipMasterIC/IC/YAGO/YAGO-S-A0008510989/YAGO-S-A0008510989-1.pdf?src-supplier=IHS+Markit, ComponentLink2Description=https://datasheet.ciiva.com/5624/pyu-rt-1-to-0-05-rohs-l-4-5624351.pdf?src-supplier=Mouser, ComponentLink2URL=https://datasheet.ciiva.com/5624/pyu-rt-1-to-0-05-rohs-l-4-5624351.pdf?src-supplier=Mouser, ComponentLink3Description=https://datasheet.ciiva.com/29721/pyu-rt-1-to-0-05-rohs-l-4-29721177.pdf?src-supplier=Digi-Key, ComponentLink3URL=https://datasheet.ciiva.com/29721/pyu-rt-1-to-0-05-rohs-l-4-29721177.pdf?src-supplier=Digi-Key, Construction=Chip, Item Type=Resistor, Manufacturer Part Number=RT0603BRD0710KL, Mounting Technology="Surface Mount", Packaging="Tape and Reel", Pins=2, Pricing 1="100=0.29800, 250=0.27800, 500=0.25900, 1000=0.23700 (GBP)", Reach SVHC Compliant=Yes, RoHS=Yes, RoHS Compliant=Yes, Stock 1=20510, Supplier 1=Rs, Technology="THIN FILM", Termination=Wraparound
R11: library part RC0603FR-0747RL, "RES SMD 47OHM 0.1W 0603", Case Code (Imperial)=0603, Case Code (Metric)=1608, LCSC Part Number=C114623, Manufacturer=Yageo, Max Operating Temperature=155°C, Max Power Dissipation=100mW, Min Operating Temperature=-55°C, Package Quantity=1, Resistance Tolerance=1%, Resistor Type="Thick Film", Supplier Part Number 1=311-47.0HRCT-ND, Temperature Coefficient=100ppm/°C, Voltage Rating=75V, Voltage Rating (DC)=50V, Case/Package=0603, Category="Chip SMD Resistors", ComponentLink1Description=https://datasheet.ciiva.com/2453/pyu-r-int-thick-7-2453922.pdf?src-supplier=Digi-Key, ComponentLink1URL=https://datasheet.ciiva.com/2453/pyu-r-int-thick-7-2453922.pdf?src-supplier=Digi-Key, ComponentLink2Description=https://datasheet.ciiva.com/2453/pyu-r-int-thick-7-2453923.pdf?src-supplier=Digi-Key, ComponentLink2URL=https://datasheet.ciiva.com/2453/pyu-r-int-thick-7-2453923.pdf?src-supplier=Digi-Key, ComponentLink3Description=https://datasheet.ciiva.com/2453/pyu-r-int-thick-7-2453924.pdf?src-supplier=Digi-Key, ComponentLink3URL=https://datasheet.ciiva.com/2453/pyu-r-int-thick-7-2453924.pdf?src-supplier=Digi-Key, ComponentLink4Description=https://datasheet.ciiva.com/7746/443971-7746363.pdf?src-supplier=Element14, ComponentLink4URL=https://datasheet.ciiva.com/7746/443971-7746363.pdf?src-supplier=Element14, ComponentLink5Description=https://datasheet.ciiva.com/7746/443971-7746364.pdf?src-supplier=Element14, ComponentLink5URL=https://datasheet.ciiva.com/7746/443971-7746364.pdf?src-supplier=Element14, ComponentLink6Description=https://datasheet.ciiva.com/46440/1868787-46440908.pdf?src-supplier=Element14, ComponentLink6URL=https://datasheet.ciiva.com/46440/1868787-46440908.pdf?src-supplier=Element14, Construction=Rectangular, Depth=0.8mm, Features="Moisture Resistant", Height=0.022inch, Lead Free="Lead Free", Length=1.6mm, Manufacturer Part Number=RC0603FR-0747RL, Military Standard=Not, Number of Pins=2, Number of Terminations=2, Packaging="Tape and Reel", Power Rating=100mW, Pricing 1="1=0.10000, 10=0.02400, 100=0.00970, 1000=0.00436, 2500=0.00378 (USD)", REACH SVHC=Unknown, Resistance=47R, RoHS=Yes, RoHS Compliant=Yes, Series=RC, Size Code=0603, Stock 1=596562, Supplier 1=Digi-Key, Termination=SMD/SMT, Tolerance=1%, Weight=7.1E-05oz, Width=0.8mm
R12 R14: library part RC0603FR-071K5L, "RES 1.5K OHM 1% 1/10W 0603", Case Code (Imperial)=0603, Case Code (Metric)=1608, LCSC Part Number=C114668, Manufacturer=Yageo, Max Operating Temperature=155°C, Max Power Dissipation=100mW, Min Operating Temperature=-55°C, Package Quantity=1, Resistance=1.5kR, Resistance Tolerance=1%, Resistor Type="Thick Film", Temperature Coefficient=100ppm/°C, Voltage Rating=50V, Case/Package=0603, Category="Chip SMD Resistors", Construction=Rectangular, Depth=0.8mm, Features="Moisture Resistant", Height=0.022inch, Item Type=Resistor, Lead Free="Lead Free", Length=0.063inch, Manufacturer Part Number=RC0603FR-071K5L, Military Standard=Not, Number of Pins=2, Number of Terminations=2, Packaging="Tape and Reel", Power Rating=100mW, Pricing 1="1=0.00160, 5000=0.00160 (USD)", REACH SVHC="No SVHC", RoHS=Yes, RoHS Compliant=Yes, Series=RC, Size Code=0603, Stock 1=15000, Supplier 1="Arrow Electronics", Supplier Part Number 1=RC0603FR-071K5L, Termination=SMD/SMT, Tolerance=1%, Voltage Rating (DC)=50V, Width=0.031inch
R13: library part RT0603BRE07270RL, "RES SMD 270 OHM 0.1% 1/10W 0603", Case/Package=0603, LCSC Part Number=C705836, Manufacturer=Yageo, Max Operating Temperature=125°C, Max Power Dissipation=100mW, Min Operating Temperature=-55°C, Package Quantity=5000, Resistor Type="Thin Film", Supplier Part Number 1=RT0603BRE07270RL-ND, Temperature Coefficient=50ppm/°C, Tolerance=0.1%, Voltage Rating (DC)=50V, Category="Chip SMD Resistors", ComponentLink1Description=https://datasheet.ciiva.com/2584/pyu-rt-1-to-0-05-rohs-l-5-2584379.pdf?src-supplier=Digi-Key, ComponentLink1URL=https://datasheet.ciiva.com/2584/pyu-rt-1-to-0-05-rohs-l-5-2584379.pdf?src-supplier=Digi-Key, Construction=Rectangular, Depth=0.8mm, Height=0.022inch, Item Type=Resistor, Lead Free="Lead Free", Length=0.063inch, Manufacturer Part Number=RT0603BRE07270RL, Military Standard=Not, Number of Terminations=2, Packaging="Tape and Reel", Pricing 1="5000=0.04770 (USD)", Resistance=270R, RoHS=Yes, RoHS Compliant=Yes, Series=RT, Supplier 1=Digi-Key, Width=0.031inch
U1: "Step-down type Fixed 12V 2A 4.5V~40V ESOP-8 DC-DC Converters ROHS", LCSC Part Number=C5185875, Manufacturer=UMW, Package=ESOP-8, ComponentLink1Description=LCSC, ComponentLink1URL=https://www.lcsc.com/product-detail/DC-DC-Converters_UMW-Youtai-Semiconductor-Co-Ltd-XL1509E-12_C5185875.html, Item Type=IC, Manufacturer Part Number=XL1509E-12
U2: "IC BINARY COUNTER 14-BIT 16SOIC", LCSC Part Number=C32699, Manufacturer="Texas Instruments", ComponentLink1Description=https://datasheet.ciiva.com/26940/getdatasheetpartid-134495-26940293.pdf?src-supplier=Verical, ComponentLink1URL=https://datasheet.ciiva.com/26940/getdatasheetpartid-134495-26940293.pdf?src-supplier=Verical, ComponentLink2Description=https://datasheet.ciiva.com/6623/cd4060b-6623678.pdf?src-supplier=Digikey, ComponentLink2URL=https://datasheet.ciiva.com/6623/cd4060b-6623678.pdf?src-supplier=Digikey, ComponentLink3Description=https://datasheet.ciiva.com/14295/cd4060b-14295847.pdf?src-supplier=Avnet, ComponentLink3URL=https://datasheet.ciiva.com/14295/cd4060b-14295847.pdf?src-supplier=Avnet, ComponentLink4Description=https://datasheet.ciiva.com/41455/001015500-da-01-en-ic-binary-counter-cd4060bm96-soic-16-tid-41455418.pdf?src-supplier=Conrad, ComponentLink4URL=https://datasheet.ciiva.com/41455/001015500-da-01-en-ic-binary-counter-cd4060bm96-soic-16-tid-41455418.pdf?src-supplier=Conrad, Item Type=IC, Manufacturer Part Number=CD4060BM96, Pricing="1=0.42, 10=0.296, 25=0.264, 100=0.2285, 250=0.2116, 500=0.20144, 1000=0.19306 (USD)", RoHS=Yes, Stock=25840, Supplier=Digikey
U3: "IC OSC SINGLE TIMER 2.7MHZ 8SOIC", LCSC Part Number=C880084, Manufacturer=STMicroelectronics, Max Supply Voltage=16V, Min Supply Voltage=2V, ComponentLink1Description=http://www.farnell.com/datasheets/1947266.pdf?src-supplier=Farnell, ComponentLink1URL=http://www.farnell.com/datasheets/1947266.pdf?src-supplier=Farnell, ComponentLink2Description=http://www.farnell.com/datasheets/1947266.pdf?src-supplier=Element14, ComponentLink2URL=http://www.farnell.com/datasheets/1947266.pdf?src-supplier=Element14, ComponentLink3Description=http://www.farnell.com/datasheets/1947266.pdf?src-supplier=Newark, ComponentLink3URL=http://www.farnell.com/datasheets/1947266.pdf?src-supplier=Newark, ComponentLink4Description=http://www.st.com/content/ccc/resource/technical/document/datasheet/45/d5/c6/11/46/d3/4b/a3/CD00000893.pdf/files/CD00000893.pdf/jcr:content/translations/en.CD00000893.pdf?src-supplier=Digikey, ComponentLink4URL=http://www.st.com/content/ccc/resource/technical/document/datasheet/45/d5/c6/11/46/d3/4b/a3/CD00000893.pdf/files/CD00000893.pdf/jcr:content/translations/en.CD00000893.pdf?src-supplier=Digikey, ComponentLink5Description=http://www.st.com/st-web-ui/static/active/en/resource/technical/document/datasheet/CD00000893.pdf?src-supplier=Avnet, ComponentLink5URL=http://www.st.com/st-web-ui/static/active/en/resource/technical/document/datasheet/CD00000893.pdf?src-supplier=Avnet, ComponentLink6Description=https://datasheet.octopart.com/TS555IDTTR-STMicroelectronics-datasheet-45197658.pdf?src-supplier=TME, ComponentLink6URL=https://datasheet.octopart.com/TS555IDTTR-STMicroelectronics-datasheet-45197658.pdf?src-supplier=TME, Height=1.75mm, Item Type=IC, Manufacturer Part Number=TS555IDTTR, Number of Channels=1NUMBER, Pricing="2500=0.36, 5000=0.355, 7500=0.35, 12500=0.345, 25000=0.335 (USD)", Propagation Delay=100ns, RoHS=Yes, Stock=50000, Supplier="Future Electronics"
U4: "IC GATE DRVR IGBT/MOSFET SOT23-6", LCSC Part Number=C156276, Manufacturer="Diodes Zetex", ComponentLink1Description=https://datasheet.ciiva.com/1949/zxgd3002e6-1949760.pdf?src-supplier=Avnet, ComponentLink1URL=https://datasheet.ciiva.com/1949/zxgd3002e6-1949760.pdf?src-supplier=Avnet, ComponentLink2Description=https://datasheet.ciiva.com/1949/zxgd3002e6-1949760.pdf?src-supplier=Digikey, ComponentLink2URL=https://datasheet.ciiva.com/1949/zxgd3002e6-1949760.pdf?src-supplier=Digikey, ComponentLink3Description=https://datasheet.ciiva.com/16957/0900766b80e4f81f-16957288.pdf?src-supplier=Allied+Electronics, ComponentLink3URL=https://datasheet.ciiva.com/16957/0900766b80e4f81f-16957288.pdf?src-supplier=Allied+Electronics, ComponentLink4Description=https://datasheet.ciiva.com/6807/28818-6807237.pdf?src-supplier=Newark, ComponentLink4URL=https://datasheet.ciiva.com/6807/28818-6807237.pdf?src-supplier=Newark, ComponentLink5Description=https://datasheet.ciiva.com/7652/28818-7652871.pdf?src-supplier=Element14, ComponentLink5URL=https://datasheet.ciiva.com/7652/28818-7652871.pdf?src-supplier=Element14, ComponentLink6Description=https://datasheet.ciiva.com/3226/zxgd3002e6-3226748.pdf?src-supplier=Avnet, ComponentLink6URL=https://datasheet.ciiva.com/3226/zxgd3002e6-3226748.pdf?src-supplier=Avnet, ComponentLink7Description=https://datasheet.ciiva.com/1949/zxgd3002e6-1949761.pdf?src-supplier=Digikey, ComponentLink7URL=https://datasheet.ciiva.com/1949/zxgd3002e6-1949761.pdf?src-supplier=Digikey, ComponentLink8Description=https://datasheet.ciiva.com/1949/zxgd3002e6-1949762.pdf?src-supplier=Digikey, ComponentLink8URL=https://datasheet.ciiva.com/1949/zxgd3002e6-1949762.pdf?src-supplier=Digikey, Item Type=IC, Manufacturer Part Number=ZXGD3002E6TA, Pricing="3000=0.275, 6000=0.265 (USD)", RoHS=No, Stock=48000, Supplier="Future Electronics"

## Free pads (board coordinates)
  round 0 hole 82.67 unplated: MH1(645,595)
  round 0 hole 82 unplated: MH2(-875,210) MH3(160,-870)

## Via types
v1: diameter 23.62, hole 11.81, Top Layer to Bottom Layer, tented both sides, 48 vias

## Nets (pads, with @x,y where several pads share a name; then routed paths per layer and width w, separated by ;. In a path a pad name is that pad's centre, name@x,y a point inside that pad or via, vN(x,y) a via of type N, cw(c..) or ccw(c..) an arc to the next point about the centre after c; other vN are vias at no path point)
+12: C3.1 C9.2 L1.2 Q5.2 R1.2 R9.2 U1.3 U2.16 | length 950.4
  Bottom Layer w40: v1(-1300.14,536) -1161.42,536 ccw(c-1161.42,636) -1090.71,565.29 v1(-871,785) -637.67,1018.33 cw(c-566.96,947.62) -566.96,1047.62 v1(-553.03,1047.62)
+12VD: C6.2 Q1.1 Q5.3 R3.2 R4.3 R7.2 R12.2 U3.4 U3.8 U4.1 | length 218.3
  Top Layer w22: R3.2 v1(-725.69,-560.31)
  other v1: -476.62,-1129.5 -425.75,-1129.5 -790,-939 -790,-899.19 -588.99,-749 -897.11,37.21 -792.63,37.21 -897.11,69.79 -792.63,69.79
+24V_IN: C1.1 C2.2 D1.2 J2.2 L2.2 U1.1
  other v1: 1066.21,528.48 1098.63,560.59 1131.05,595.23 219,1150.48 311,1150.48 219,1224.97 311,1224.97
DISCH: R3.1 R4.2 R8.2 R10.3 U3.7 | length 999.7
  Top Layer w16: R4.2 -993,-313.57 R10.3 ; R3.1 -944,-875 -918.19,-849.19 v1(-790,-849.19)
  Bottom Layer w16: R10.3 -790,-516.57 v1(-790,-849.19)
"G_Drive IN": R13.1 U4.2 U4.5
GND: C1.2 C2.1 C3.2 C6.1 C7.1 C8.1 C9.1 D2.1 J3.2 J4.2 LED1.2 Q1.2 Q2.2 Q3.3 Q4.2 U1.4 U1.5 U1.6 U1.7 U1.8 U1.9 U2.8 U2.12 U3.1 U4.3
  other v1: 662.85,-719.48 1093,224 1186.39,253.81 1070,316 1163.39,345.81 -1033,400 -976,550 -808,711.42 -365,833.52 -273,833.52 219,861.03 311,861.03 -365,938 -273,938 -112.16,956 -19.84,956 219,965.52 311,965.52 -112.16,1012 -19.84,1012 65.28,1012.12
MG1: Q3.1 R6.1
NetC4_1: C4.1 R2.1 R5.1
NetC4_2: C4.2 U2.9 | length 329.4
  Top Layer w12: U2.9 -883.12,400 -868.12,385 -728,385 -705,408 C4.2
NetC5_2: C5.2 L2.1 Q3.2
  other v1: 47.21,-1271.7 131.21,-1271.7 215.21,-1271.7 47.21,-1192.3 131.21,-1192.3 215.21,-1192.3
NetC7_2: C7.2 U3.5
NetD1_1: D1.1 J1.2
NetD2_2: D2.2 L1.1 U1.2
NetF1_1: F1.1 J3.4
NetF1_2: F1.2 J1.1
NetJ2_1: J2.1 Q1.3
NetLED1_1: LED1.1 R1.1
NetQ2_1: Q2.1 Q4.3 R12.1
NetQ2_3: Q2.3 R7.1 R13.2
NetQ4_1: Q4.1 R14.2
NetQ5_1: Q5.1 R9.1 R11.2
NetR2_2: R2.2 U2.11 | length 58.7
  Top Layer w12: U2.11 R2.2
NetR5_2: R5.2 U2.10 | length 85.6
  Top Layer w12: U2.10 -890.15,450 -878.74,438.58 R5.2
NetR6_2: R6.2 U4.4 U4.6
NetR11_1: R11.1 U2.3 | length 65.7
  Top Layer w12: R11.1 U2.3
OUT: R14.1 U3.3 | length 320.1
  Top Layer w16: U3.3 -486.12,-799.19 -457,-828.31 R14.1
PIEZO+: C5.1 J4.1
TRIG: C8.2 R8.1 R10.2 U3.2 U3.6 | length 902.1
  Top Layer w16: R10.2 -993,-503.31 R8.1 -1050,-757.51 -1008.32,-799.19 U3.6 -731.81,-799.19 -681.81,-849.19 U3.2 C8.2
pads on no net: J3.3 J3.MH J4.MP1 J4.MP2 R4.1 R10.1 U2.1 U2.2 U2.4 U2.5 U2.6 U2.7 U2.13 U2.14 U2.15

## Polygon pours and split planes (outlines as drawn)
GND on Top Layer "GND_L01_P000" (solid, remove dead copper, pour order 0): -1500,0 ccw(c0,0) 0,-1500 ccw(c0,0) 1500,0 ccw(c0,0) 0,1500 ccw(c0,0)
NetC5_2 on Top Layer "NETC5_2_L01_P017" (solid, remove dead copper, pour order 17): 960.14,-1078.14 842,-960 -16.8,-960 -16.8,-1369.8 313.9,-1369.8 313.9,-1114.14 752.42,-1114.14 838.28,-1200
+12VD on Top Layer "+12VD_L01_P009" (solid, remove dead copper, pour order 9): -761,17 -761,90 -1011,90 -1011,358 -1209.2,358 -1209.2,415.37 -1262.74,415.37 -1262.74,187.03 -1102.14,187.03 -1102.14,17
+24V_IN on Top Layer "+24V_IN_L01_P016" (solid, remove dead copper, pour order 16): 1033.01,732.25 920.04,619.27 1037.31,502 1076.8,502 1170.03,595.23
NetD1_1 on Top Layer "NETD1_1_L01_P015" (solid, remove dead copper, pour order 15): 910.32,799.01 994.58,714.74 1049.15,769.31 1155.83,663.93 1258,762 1149.62,869.77 1026.08,989.15 873.13,836.2
NetF1_2 on Top Layer "NETF1_2_L01_P014" (solid, remove dead copper, pour order 14): 766.92,498 742.01,597.94 746.25,960.18 831.52,1046.34 937.43,940.43 820.32,823.32 900.88,531.4
+12 on Top Layer "+12_L01_P007" (solid, remove dead copper, pour order 7): -79.19,1074.89 -79.19,1175.38 -153.17,1249.36 -153.17,1400 -365,1400 -582.45,1182.55 -582.45,1017 -201,1017 -201,1139 -201,1143 -111,1143 -111,1074.89
NetD2_2 on Top Layer "NETD2_2_L01_P004" (solid, remove dead copper, pour order 4): -29.19,1070 -29.19,1198 38.81,1266 208.05,1266 208.05,1400 -129.19,1400 -129.19,1260.83 -66,1197.64 -66,1070
+24V_IN on Top Layer "+24V_IN_L01_P003" (solid, remove dead copper, pour order 3): 328.91,1243.79 331.11,1074.89 -2.81,1074.89 -2.81,1197.64 -3.17,1198 42.61,1243.79
GND on Bottom Layer "GND_L02_P001" (solid, remove dead copper, pour order 1): -1500,0 ccw(c0,0) 0,-1500 ccw(c0,0) 1500,0 ccw(c0,0) 0,1500 ccw(c0,0)
+12VD on Bottom Layer "+12VD_L02_P019" (solid, remove dead copper, pour order 19): -822.65,-930.69 ccw(c-609.13,-926.52) -609.13,-1140.08 -599,-1140 -368,-1140 -368,-911 -608,-911 -608,-799.19 -553.42,-799.19 -553.42,80 -949,80 -949,-360 -882.99,-360 -756.07,-488.41 -756.07,-868 -823.88,-868
+24V_IN on Bottom Layer "+24V_IN_L02_P018" (solid, remove dead copper, pour order 18): -850,-904.14 ccw(c-605.78,-904.14) -607.35,-1148.36 -352.59,-1150 214.29,-1150 ccw(c214.29,-345.57) 639.01,-1028.74 793.17,-1280.92 cw(c-0.31,-0.15) 1371.28,623.31 1047,476 1046.89,475.95 ccw(c0,0) -850,-774.6

## Other copper
Top Layer:
  rectangle net +12VD: -659.01,-761 -575.88,-724
  rectangle net NetQ4_1: -533.74,-1033.74 -501.46,-947.38
  rectangle net +12VD: -871.61,-1053 -770,-887.38
  rectangle net NetC7_2: -884,-761 -810.58,-665
  rectangle net DISCH: -1087,-1001.25 -916.44,-938
  rectangle net NetR6_2: -373.68,-1005.5 -252.32,-964.88
  rectangle net +12: -956.23,732.5 -853,802